# EAGLE board esp32_carrier (EAGLE 9.6.2)
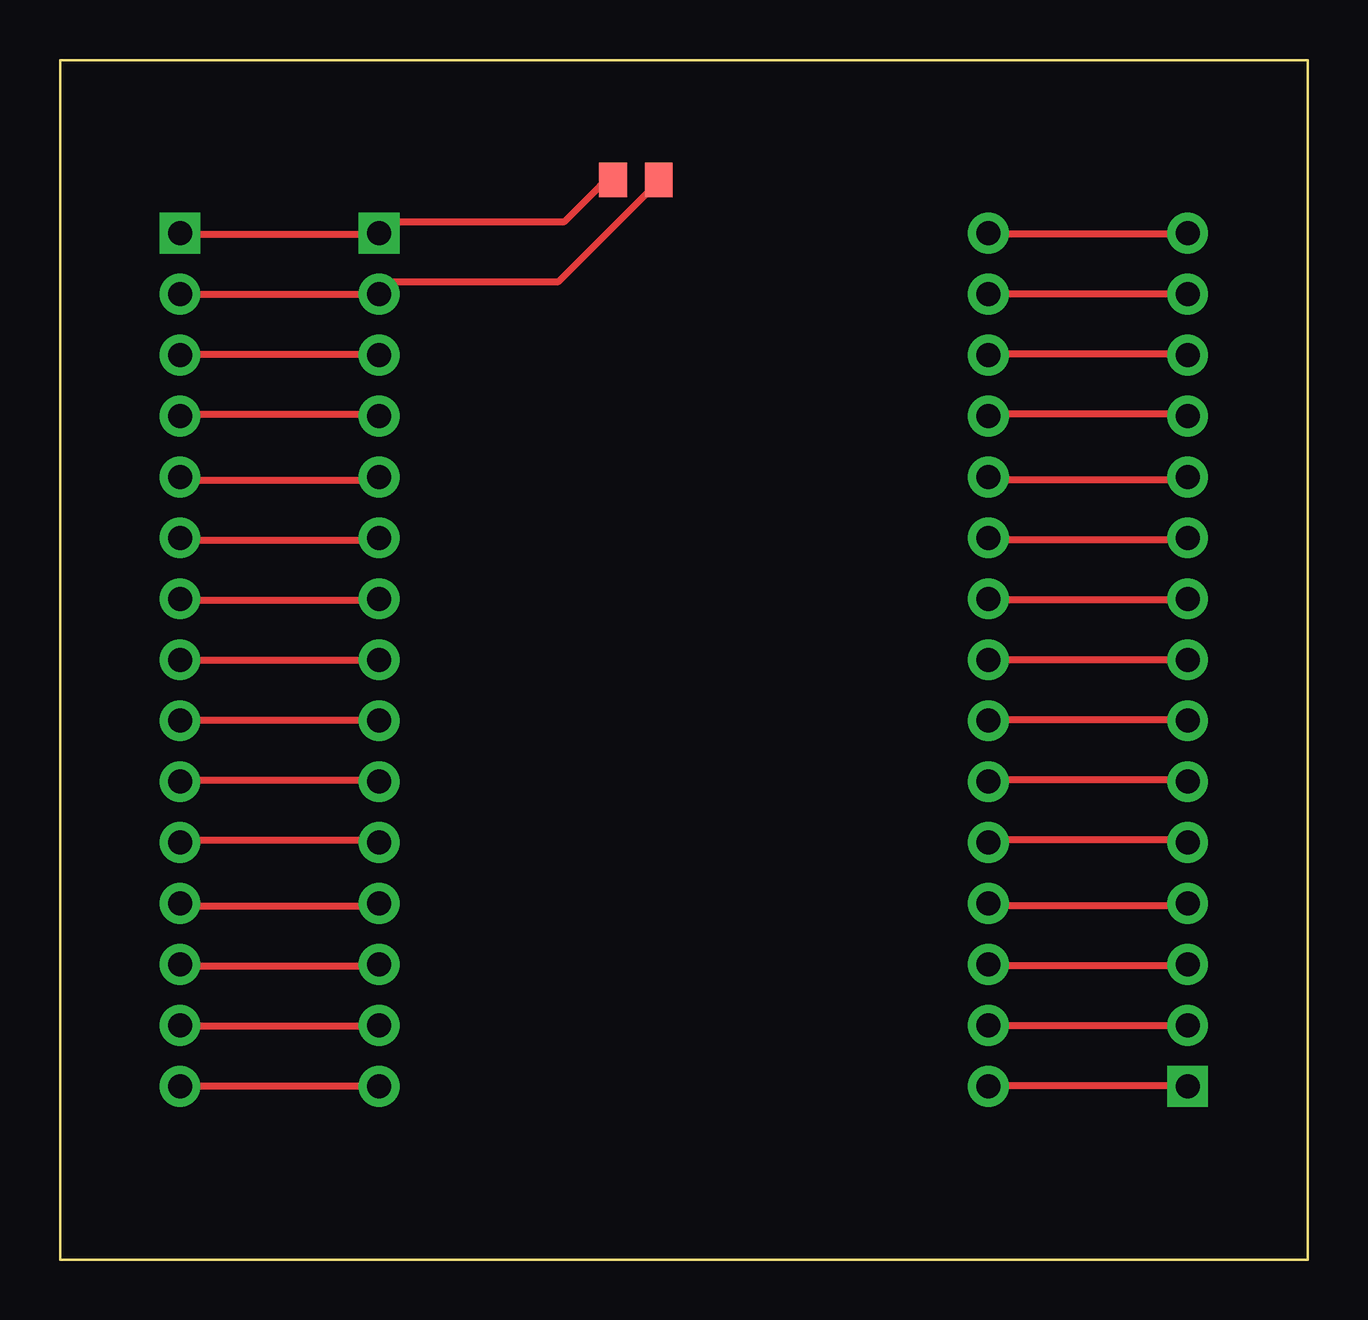
[diagram p0: board, top side]

Size 52 x 50 mm. Coordinates in mm from the lower left corner, seen from the top.
Outline: 0,0 52,0 52,50 0,50 0,0
Copper layers used: Top
Design rules "eh3d-kit": minimum track width 0.15mm, minimum drill 0.3mm, track to track 0.15mm, track to pad 0.15mm, pad to pad 0.15mm, via to via 0.15mm, smd to smd 0.15mm, copper to edge 0.3mm, drill to drill 0.25mm, minimum pad ring 0.15mm, minimum via ring 0.15mm

## Footprints (pad centres in the part's own frame; a part is rotated, then mirrored left to right if it is on the bottom)
CHIP-0805 = smd 1.15 x 1.45: 1 -0.95,0; 2 0.95,0
HDR-1X15 = drill 1 pad 1.7 square: 1 -17.78,0 | drill 1 pad 1.7: 2 -15.24,0; 3 -12.7,0; 4 -10.16,0; 5 -7.62,0; 6 -5.08,0; 7 -2.54,0; 8 0,0; 9 2.54,0; 10 5.08,0; 11 7.62,0; 12 10.16,0; 13 12.7,0; 14 15.24,0; 15 17.78,0
MODULE-ESP32-TYPE = drill 1 pad 1.7 square: 1 -12.7,17.78 | drill 1 pad 1.7: 2 -12.7,15.24; 3 -12.7,12.7; 4 -12.7,10.16; 5 -12.7,7.62; 6 -12.7,5.08; 7 -12.7,2.54; 8 -12.7,0; 9 -12.7,-2.54; 10 -12.7,-5.08; 11 -12.7,-7.62; 12 -12.7,-10.16; 13 -12.7,-12.7; 14 -12.7,-15.24; 15 -12.7,-17.78; 16 12.7,-17.78; 17 12.7,-15.24; 18 12.7,-12.7; 19 12.7,-10.16; 20 12.7,-7.62; 21 12.7,-5.08; 22 12.7,-2.54; 23 12.7,0; 24 12.7,2.54; 25 12.7,5.08; 26 12.7,7.62; 27 12.7,10.16; 28 12.7,12.7; 29 12.7,15.24; 30 12.7,17.78

## Placement (x,y rotation side)
C1  10u  [CHIP-0805]  24,45 0 top
J1  LEFT  [HDR-1X15]  5,25 270 top
J2  RIGHT  [HDR-1X15]  47,25 90 top
M1  ESP32-TYPE  [MODULE-ESP32-TYPE]  26,25 0 top

## Library data of the parts
C1 J1 J2 M1 = eh3d-kit

## Nets
GND: C1.2 J1.2 M1.2
IO3: J1.3 M1.3
IO4: J1.4 M1.4
IO5: J1.5 M1.5
IO6: J1.6 M1.6
IO7: J1.7 M1.7
IO8: J1.8 M1.8
IO9: J1.9 M1.9
IO10: J1.10 M1.10
IO11: J1.11 M1.11
IO12: J1.12 M1.12
IO13: J1.13 M1.13
IO14: J1.14 M1.14
IO15: J1.15 M1.15
IO16: J2.1 M1.16
IO17: J2.2 M1.17
IO18: J2.3 M1.18
IO19: J2.4 M1.19
IO20: J2.5 M1.20
IO21: J2.6 M1.21
IO22: J2.7 M1.22
IO23: J2.8 M1.23
IO24: J2.9 M1.24
IO25: J2.10 M1.25
IO26: J2.11 M1.26
IO27: J2.12 M1.27
IO28: J2.13 M1.28
IO29: J2.14 M1.29
IO30: J2.15 M1.30
V3V3: C1.1 J1.1 M1.1

## Tracks (layer width: path | path; a pad name or v marks a point on that pad's centre or on a via)
GND
  Top 0.3: J1.2 5.5,40.25 12.75,40.25 M1.2 13.75,40.75 20.75,40.75 24.5,44.5 C1.2
IO3
  Top 0.3: J1.3 5.5,37.75 12.75,37.75 M1.3
IO4
  Top 0.3: J1.4 5.5,35.25 12.75,35.25 M1.4
IO5
  Top 0.3: J1.5 5.5,32.5 12.75,32.5 M1.5
IO6
  Top 0.3: J1.6 5.5,30 12.75,30 M1.6
IO7
  Top 0.3: J1.7 5.5,27.5 12.75,27.5 M1.7
IO8
  Top 0.3: J1.8 M1.8
IO9
  Top 0.3: J1.9 5.5,22.5 12.75,22.5 M1.9
IO10
  Top 0.3: J1.10 5.5,20 12.75,20 M1.10
IO11
  Top 0.3: J1.11 5.5,17.5 12.75,17.5 M1.11
IO12
  Top 0.3: J1.12 5.5,14.75 12.75,14.75 M1.12
IO13
  Top 0.3: J1.13 5.5,12.25 12.75,12.25 M1.13
IO14
  Top 0.3: J1.14 5.5,9.75 12.75,9.75 M1.14
IO15
  Top 0.3: J1.15 5.5,7.25 12.75,7.25 M1.15
IO16
  Top 0.3: J2.1 46.5,7.25 39.25,7.25 M1.16
IO17
  Top 0.3: J2.2 46.5,9.75 39.25,9.75 M1.17
IO18
  Top 0.3: J2.3 46.5,12.25 39.25,12.25 M1.18
IO19
  Top 0.3: J2.4 46.5,14.75 39.25,14.75 M1.19
IO20
  Top 0.3: J2.5 46.5,17.5 39.25,17.5 M1.20
IO21
  Top 0.3: J2.6 46.5,20 39.25,20 M1.21
IO22
  Top 0.3: J2.7 46.5,22.5 39.25,22.5 M1.22
IO23
  Top 0.3: J2.8 M1.23
IO24
  Top 0.3: J2.9 46.5,27.5 39.25,27.5 M1.24
IO25
  Top 0.3: J2.10 46.5,30 39.25,30 M1.25
IO26
  Top 0.3: J2.11 46.5,32.5 39.25,32.5 M1.26
IO27
  Top 0.3: J2.12 46.5,35.25 39.25,35.25 M1.27
IO28
  Top 0.3: J2.13 46.5,37.75 39.25,37.75 M1.28
IO29
  Top 0.3: J2.14 46.5,40.25 39.25,40.25 M1.29
IO30
  Top 0.3: J2.15 46.5,42.75 39.25,42.75 M1.30
V3V3
  Top 0.3: J1.1 5.5,42.75 12.75,42.75 M1.1 13.75,43.25 21,43.25 22.5,44.75 C1.1